# Altium PCB Zotino-DIOT.PCBDOC (part 1 of 11)
Units mil, origin at the board's own origin, x right, y up, seen from the top; angles counter-clockwise.
Board outline 8771.61 x 3949.04 mil, 4 copper layers (TopLayer, Internal Plane 2, Signal Layer 1, BottomLayer), stack 61.54 mil thick; 915 components, 534 nets, 3073 pads, 1180 vias.
Unrouted connection lines stored in the file: 36.
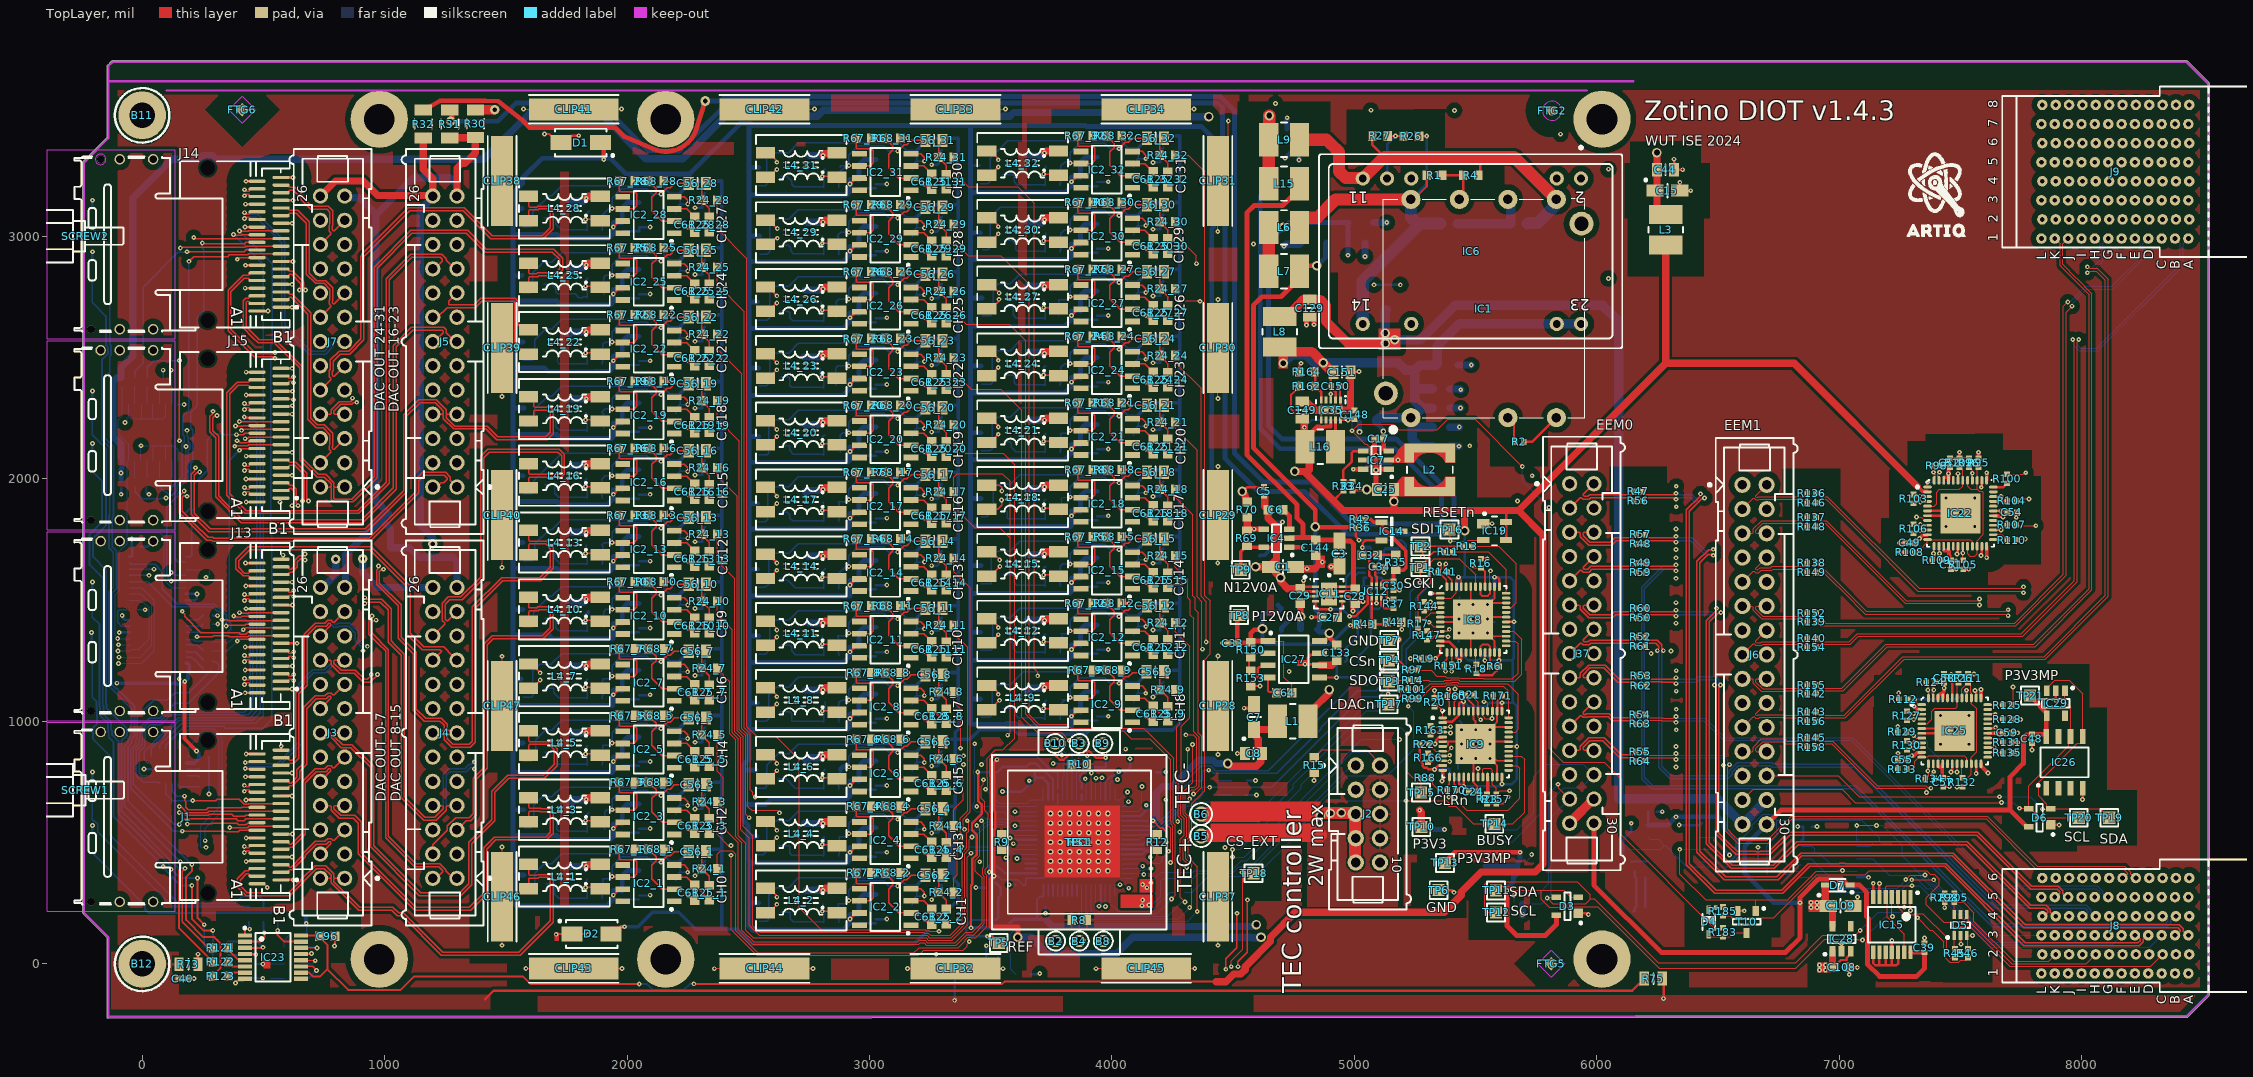
[diagram p0: TopLayer view]
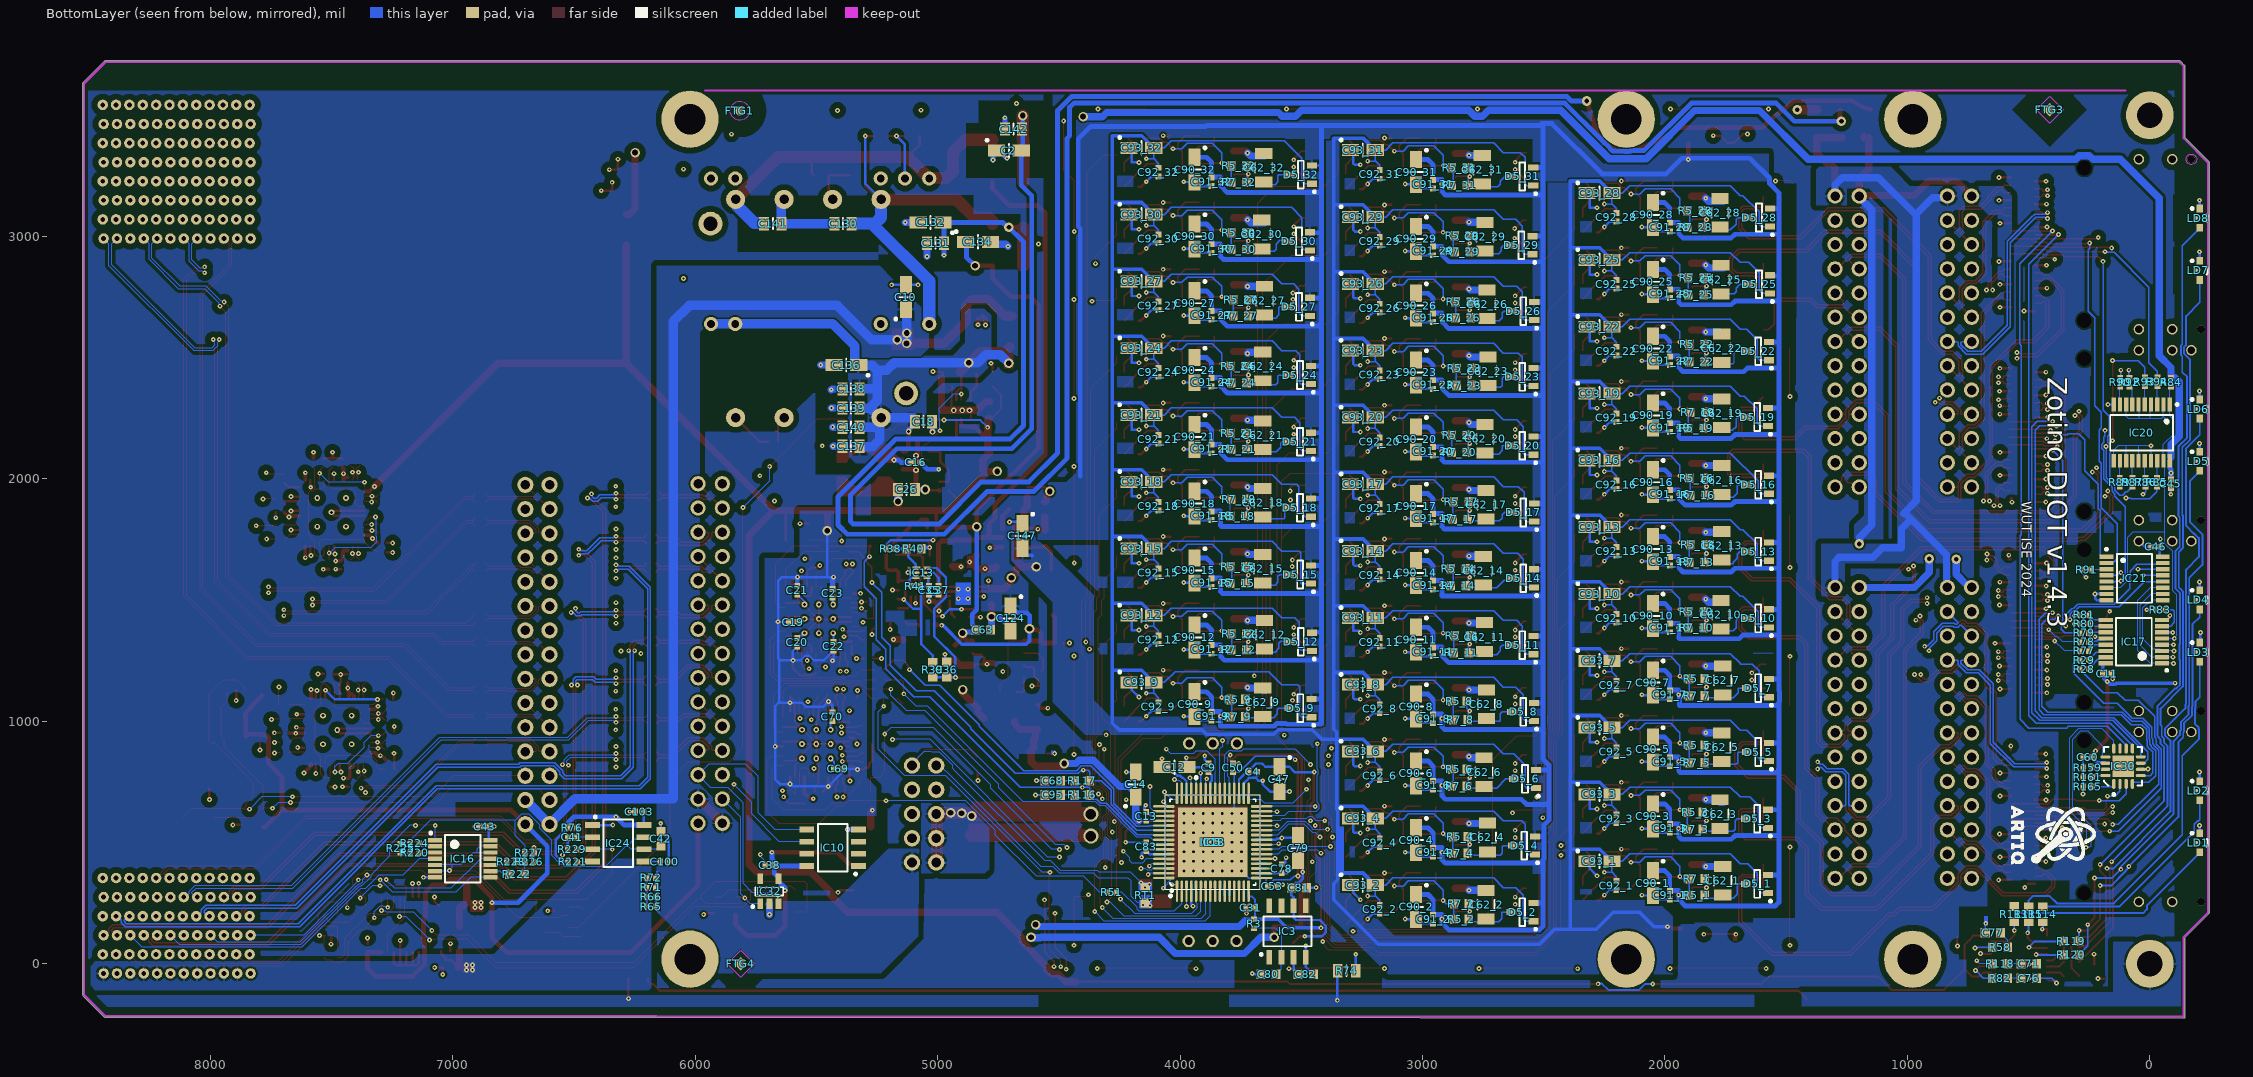
[diagram p1: BottomLayer view, seen from below]
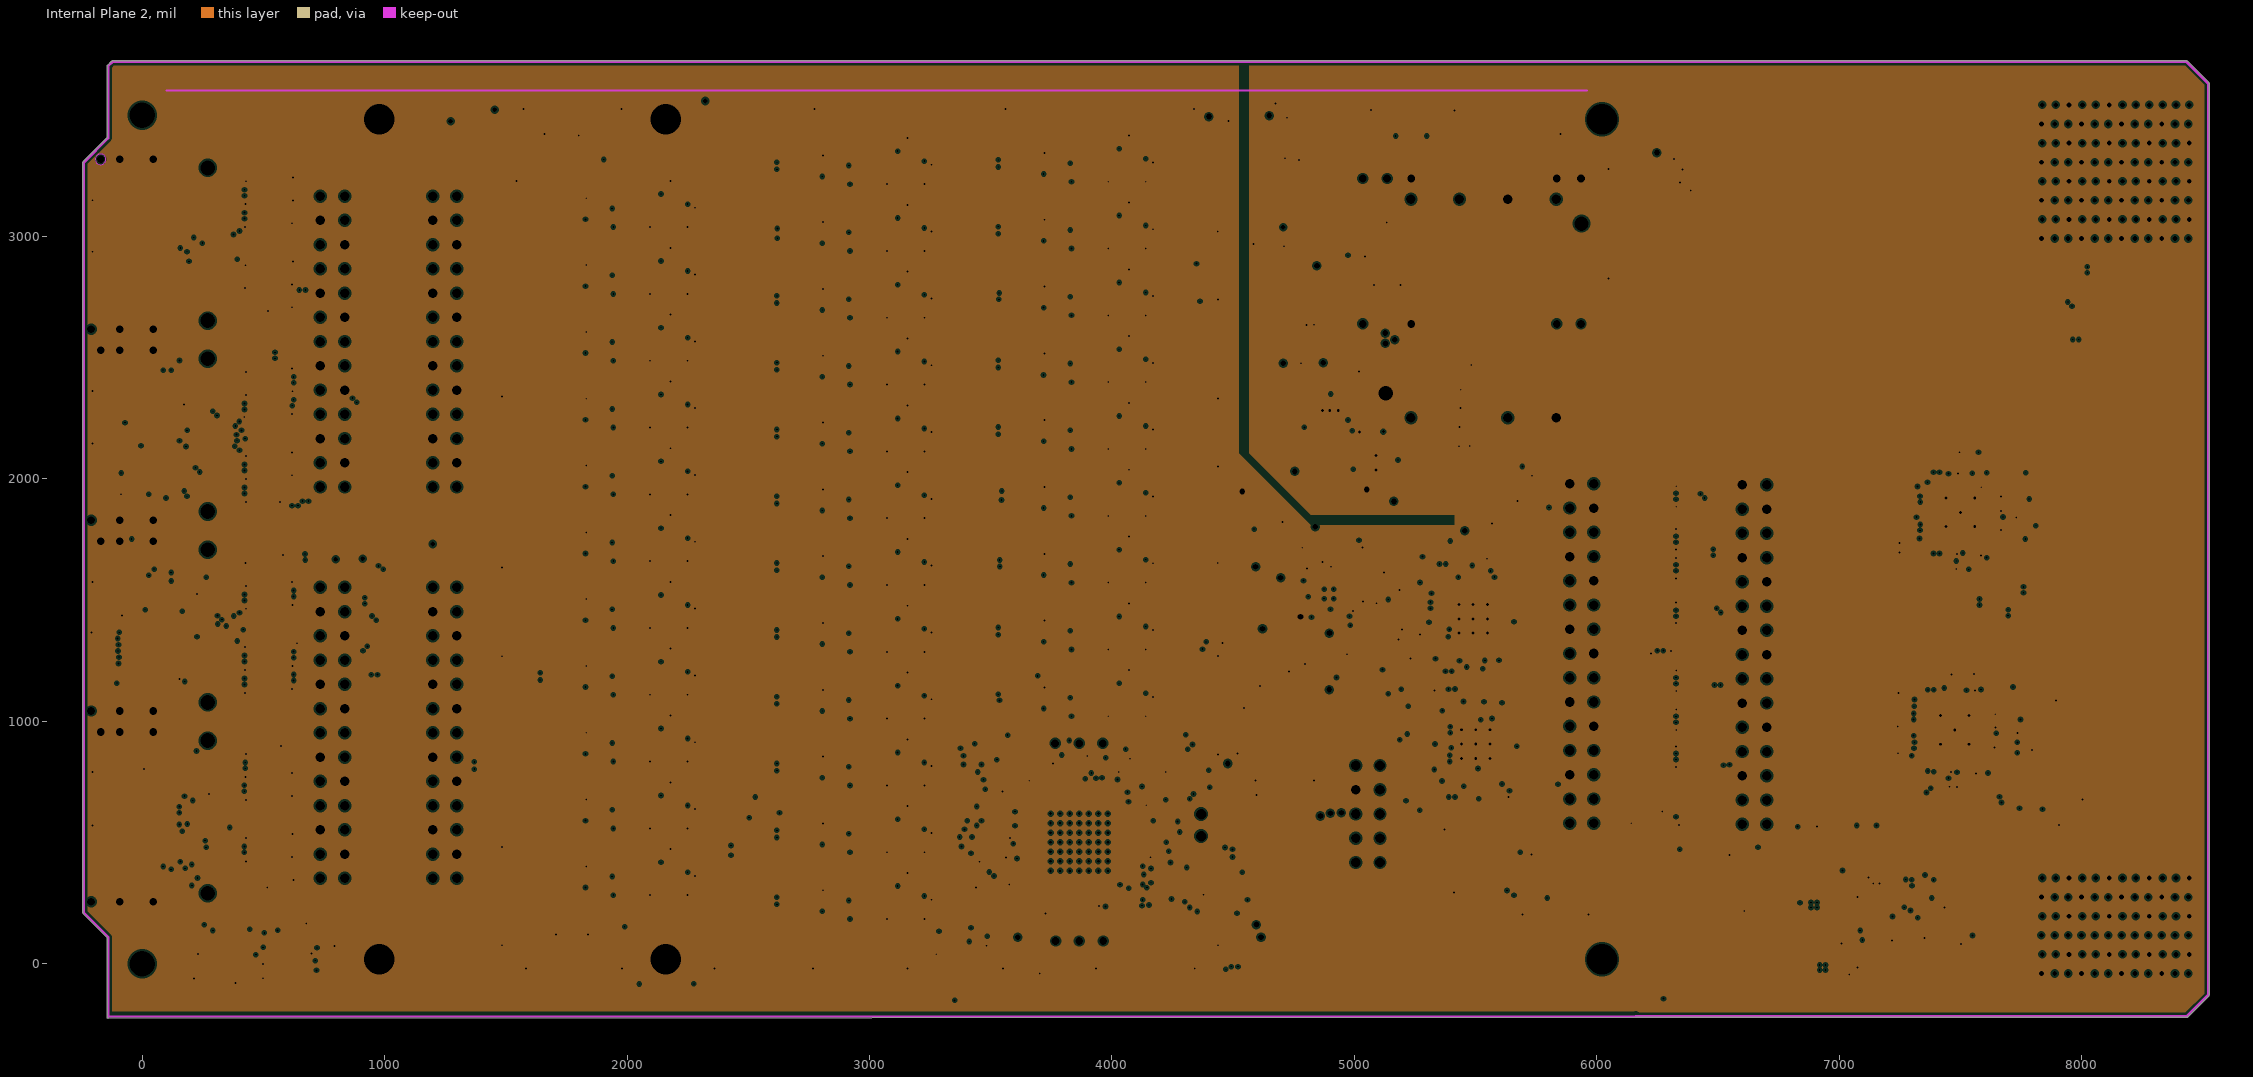
[diagram p2: Internal Plane 2, clearances drawn from the general rule]
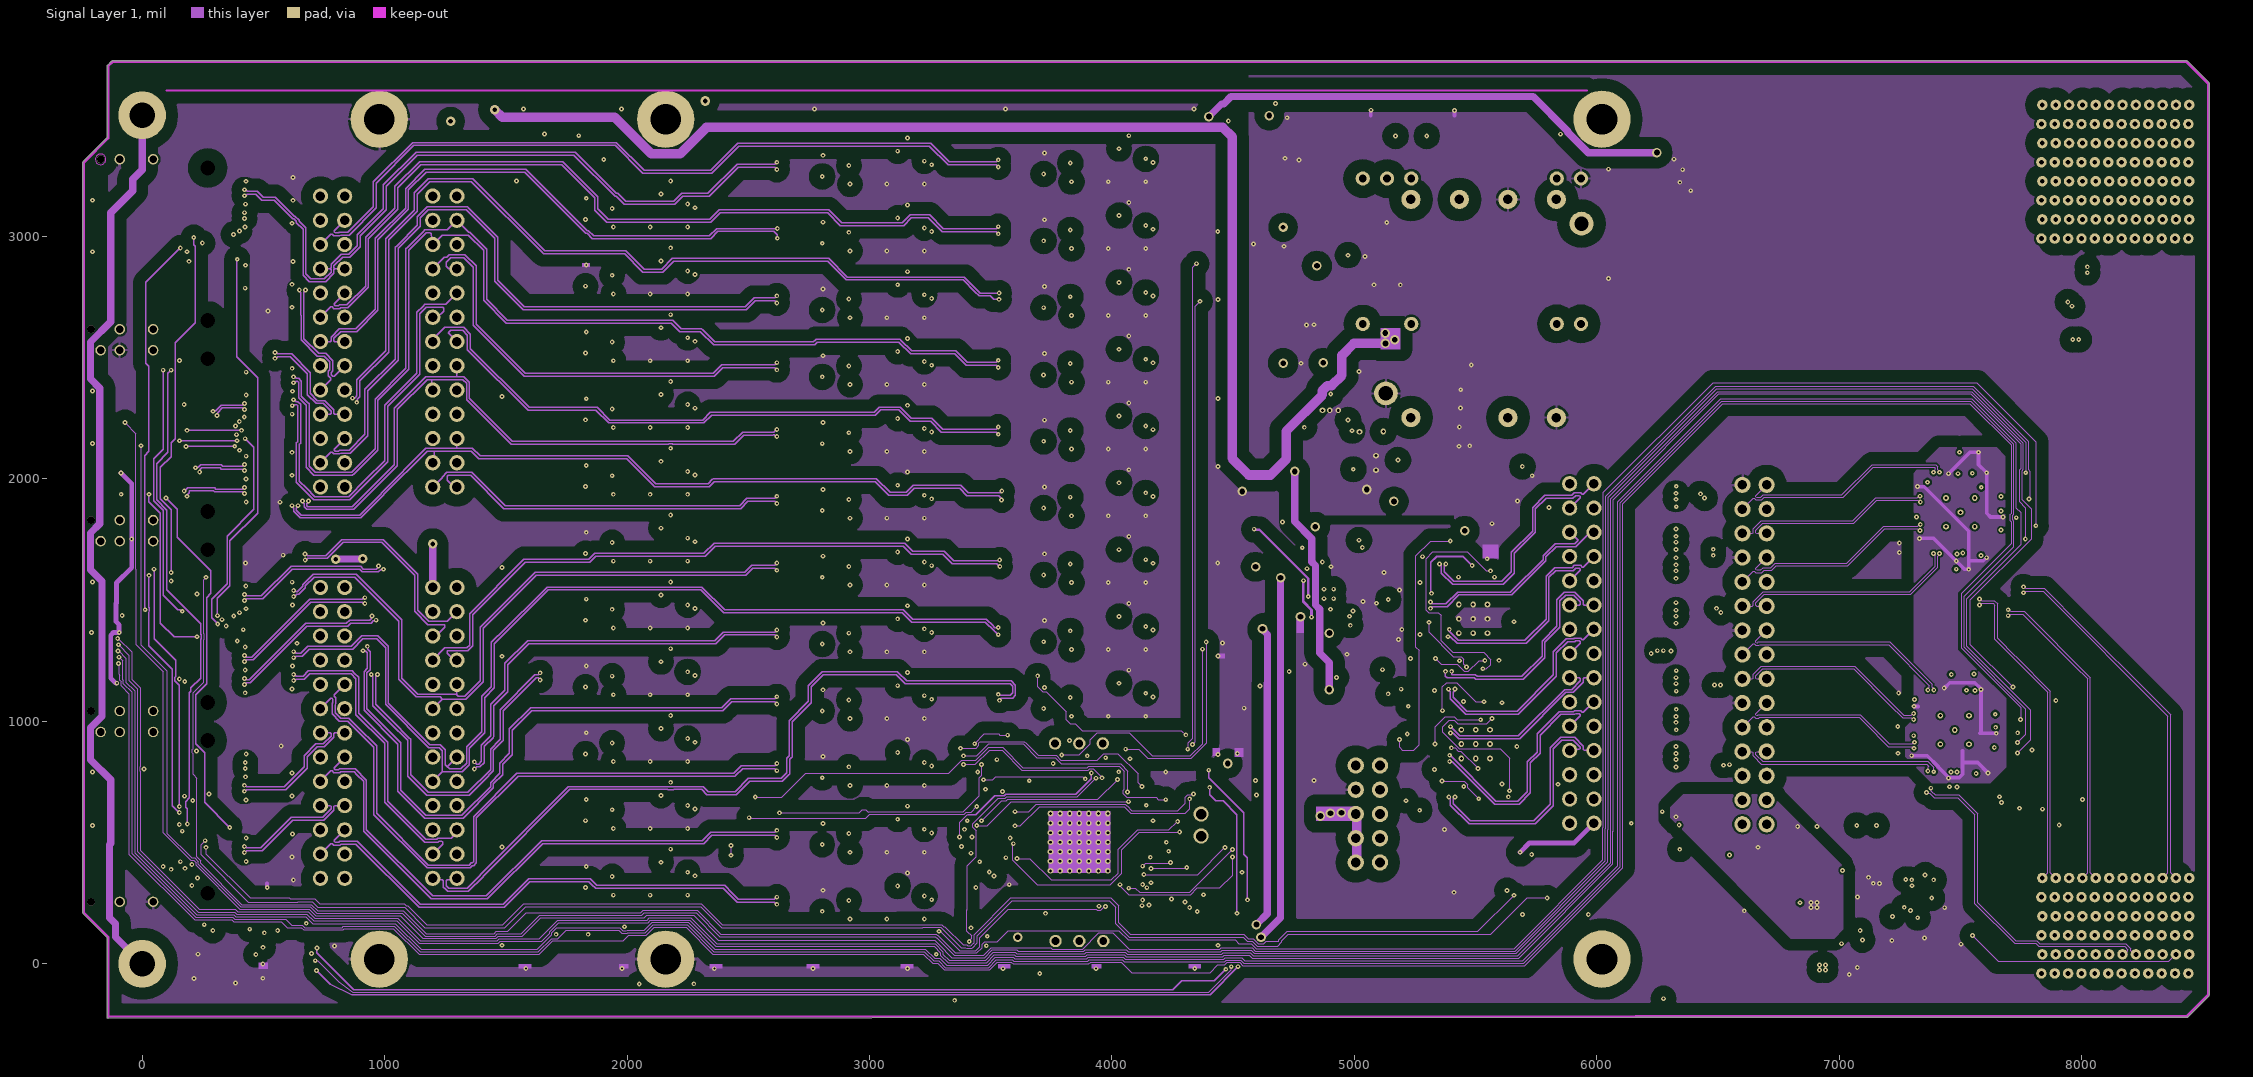
[diagram p3: Signal Layer 1]

## Layer stack, top to bottom
TopSolder: solder mask 0.4, Solder Resist, Dk 3.5
TopLayer: signal copper 1.4
Dielectric1: core 14.1732, FR-4, Dk 4.8
Internal Plane 2: plane copper 1.4169, net GND
Dielectric 3: prepreg 27.5591, Dk 4.2
Signal Layer 1: signal copper 1.4173
Dielectric 5: core 14.1732, Dk 4.2
BottomLayer: signal copper 1.4
BottomSolder: solder mask 0.4, Solder Resist, Dk 3.5

## Board outline
-145.01,108.47 -243.7,207.16 -245.17,210.71 -245.17,3304.89 -243.7,3308.44 -145.01,3407.12 -145.01,3702.3 -143.55,3705.84 -125.84,3723.55 -122.29,3725.02 6142.22,3725.02 8432.83,3725.02 8436.38,3723.55 8524.96,3634.97 8526.43,3631.43 8526.43,-128.42 8524.96,-131.96 8437.42,-219.51 8433.87,-220.98 6160.04,-220.98 -140,-224.01 cw(c-140,-219) -145.01,-219

## Design rules (kind name [scope] priority, off if disabled: settings)
AcuteAngle [All] p1: minimum=6.00000000000000E+0001 checktracksonly=FALSE
Clearance Clearance_GND_L3 [InNamedPolygon('GND_L3')] p1: gap=50 ignorepadtopadclearanceinfootprint=FALSE except(25: Via-Via Via-Fill Via-Poly Via-Region Via-Text Via-Hole)
Clearance Clearance_balancing [InNamedPolygon('balancing')] p2: gap=8.27 ignorepadtopadclearanceinfootprint=FALSE except(12.6: Arc-Fill Arc-Poly Arc-Region Track-Fill Track-Poly Track-Region; 23.62: THPad-Fill THPad-Poly THPad-Region Via-Fill Via-Poly Via-Region Fill-Fill Fill-Poly Fill-Region Poly-Poly Poly-Region Region-Region; 90.55: SMDPad-Fill SMDPad-Poly SMDPad-Region)
Clearance Clearance_DIFF [(InDifferentialPairClass('All Differential Pairs')and IsTrack ) vs (InDifferentialPairClass('All Differential Pairs') and IsTrack  )] p3 off: gap=20 ignorepadtopadclearanceinfootprint=FALSE except(0: Arc-Hole Track-Hole SMDPad-Hole THPad-Hole Via-Hole Fill-Hole Poly-Hole Region-Hole Text-Hole; 5: SMDPad-SMDPad SMDPad-THPad SMDPad-Via SMDPad-Fill SMDPad-Poly SMDPad-Region SMDPad-Text THPad-THPad THPad-Via THPad-Fill THPad-Poly THPad-Region THPad-Text Via-Via Via-Fill Via-Poly Via-Region Via-Text)
Clearance [All] p4: gap=5 ignorepadtopadclearanceinfootprint=FALSE except(0: Arc-Hole Track-Hole SMDPad-Hole THPad-Hole Via-Hole Fill-Hole Poly-Hole Region-Hole Text-Hole; 8: Arc-Poly Track-Poly SMDPad-Poly THPad-Poly Via-Poly Fill-Poly Poly-Poly)
ComponentClearance [All] p1: gap=0 collisioncheckmode=3 verticalgap=0 showdistances=FALSE
DiffPairsRouting [All] p1: maxlimit=6 minlimit=5 mostfreqgap=6 toplayer_minwidth=5 toplayer_maxwidth=6 toplayer_prefwidth=6 midlayer1_minwidth=5 midlayer1_maxwidth=6 midlayer1_prefwidth=6 bottomlayer_minwidth=5 bottomlayer_maxwidth=6 bottomlayer_prefwidth=6 maxuncoupledlength=1000
FabricationTestPointUsage TestPointUsage [All] p1: valid=0 allowmultiple=FALSE
FabricationTestpoint Testpoint [All] p1: side=3 testpointundercomponent=TRUE minsize=40 maxsize=100 preferedsize=60 minholesize=20 maxholesize=40 preferedholesize=32 testpointgrid=1 allowsidetop=TRUE allowsidebottom=TRUE usegrid=TRUE gridtolerance=0.01
Height [All] p1: minheight=0 maxheight=1574.8 prefheight=1574.8
HoleSize [All] p1: absolutevalues=TRUE maxlimit=150 minlimit=1 maxpercent=80.000 minpercent=20.000
HoleToHoleClearance [All] p1: gap=1 allowstackedmicrovias=TRUE
MinimumSolderMaskSliver [All] p1: minsoldermaskwidth=0
PlaneClearance [All] p1: clearance=7.87
PlaneConnect [All] p1: planeconnectstyle=Direct reliefexpansion=20 reliefentries=4 reliefconductorwidth=10 reliefairgap=10
PolygonConnect PolygonConnect_pad [(InPadClass('All Pads'))] p1: connectstyle=Relief reliefconductorwidth=10 reliefentries=4 polygonreliefangle="90 Angle" airgapwidth=10
PolygonConnect [All] p2: connectstyle=Direct reliefconductorwidth=10 reliefentries=4 polygonreliefangle="45 Angle" airgapwidth=10
RoomDefinition Zotino-DIOT [InComponentClass('Zotino-DIOT')] p1 off: confinementstyle=ConfineIn formatcopy=TRUE lockcomponents=FALSE outline -4140,-6217 -2140,-6217 -2140,-5217 -4140,-5217
RoomDefinition U_Supply_DAC [InComponentClass('U_Supply_DAC')] p2 off: confinementstyle=ConfineIn formatcopy=TRUE lockcomponents=FALSE outline 6257.64,2007.41 4741.89,2007.41 4741.89,-157.94 6257.64,-157.94
RoomDefinition U_LVDS_IFC_DAC [InComponentClass('U_LVDS_IFC_DAC')] p3 off: confinementstyle=ConfineIn formatcopy=TRUE lockcomponents=FALSE outline 4702.52,-138.26 6159.21,-138.26 6159.21,1869.61 4702.52,1869.61
RoomDefinition U_Output_channel1 [InComponentClass('U_Output_channel1')] p4 off: confinementstyle=ConfineIn formatcopy=TRUE lockcomponents=FALSE outline 1543.56,224.19 2417.58,224.19 2417.58,499.78 1543.56,499.78
RoomDefinition U_Output_channel2 [InComponentClass('U_Output_channel2')] p5 off: confinementstyle=ConfineIn formatcopy=TRUE lockcomponents=FALSE outline 2519.94,125.76 3393.96,125.76 3393.96,401.35 2519.94,401.35
RoomDefinition U_Output_channel3 [InComponentClass('U_Output_channel3')] p6 off: confinementstyle=ConfineIn formatcopy=TRUE lockcomponents=FALSE outline 1543.56,499.78 2417.58,499.78 2417.58,775.37 1543.56,775.37
RoomDefinition U_Output_channel4 [InComponentClass('U_Output_channel4')] p7 off: confinementstyle=ConfineIn formatcopy=TRUE lockcomponents=FALSE outline 2519.94,401.35 3393.96,401.35 3393.96,676.95 2519.94,676.95
RoomDefinition U_Output_channel5 [InComponentClass('U_Output_channel5')] p8 off: confinementstyle=ConfineIn formatcopy=TRUE lockcomponents=FALSE outline 1543.56,775.37 2417.58,775.37 2417.58,1050.96 1543.56,1050.96
RoomDefinition U_Output_channel6 [InComponentClass('U_Output_channel6')] p9 off: confinementstyle=ConfineIn formatcopy=TRUE lockcomponents=FALSE outline 2519.94,676.95 3393.96,676.95 3393.96,952.54 2519.94,952.54
RoomDefinition U_Output_channel7 [InComponentClass('U_Output_channel7')] p10 off: confinementstyle=ConfineIn formatcopy=TRUE lockcomponents=FALSE outline 1543.56,1050.96 2417.58,1050.96 2417.58,1326.55 1543.56,1326.55
RoomDefinition U_Output_channel8 [InComponentClass('U_Output_channel8')] p11 off: confinementstyle=ConfineIn formatcopy=TRUE lockcomponents=FALSE outline 2519.94,952.54 3393.96,952.54 3393.96,1228.13 2519.94,1228.13
RoomDefinition U_Output_channel9 [InComponentClass('U_Output_channel9')] p12 off: confinementstyle=ConfineIn formatcopy=TRUE lockcomponents=FALSE outline 3433.33,962.38 4307.34,962.38 4307.34,1237.97 3433.33,1237.97
RoomDefinition U_Output_channel10 [InComponentClass('U_Output_channel10')] p13 off: confinementstyle=ConfineIn formatcopy=TRUE lockcomponents=FALSE outline 1543.56,1326.55 2417.58,1326.55 2417.58,1602.14 1543.56,1602.14
RoomDefinition U_Output_channel11 [InComponentClass('U_Output_channel11')] p14 off: confinementstyle=ConfineIn formatcopy=TRUE lockcomponents=FALSE outline 2519.94,1228.13 3393.96,1228.13 3393.96,1503.72 2519.94,1503.72
RoomDefinition U_Output_channel12 [InComponentClass('U_Output_channel12')] p15 off: confinementstyle=ConfineIn formatcopy=TRUE lockcomponents=FALSE outline 3433.33,1237.97 4307.34,1237.97 4307.34,1513.56 3433.33,1513.56
RoomDefinition U_Output_channel13 [InComponentClass('U_Output_channel13')] p16 off: confinementstyle=ConfineIn formatcopy=TRUE lockcomponents=FALSE outline 1543.56,1602.14 2417.58,1602.14 2417.58,1877.73 1543.56,1877.73
RoomDefinition U_Output_channel14 [InComponentClass('U_Output_channel14')] p17 off: confinementstyle=ConfineIn formatcopy=TRUE lockcomponents=FALSE outline 2519.94,1503.72 3393.96,1503.72 3393.96,1779.31 2519.94,1779.31
RoomDefinition U_Output_channel15 [InComponentClass('U_Output_channel15')] p18 off: confinementstyle=ConfineIn formatcopy=TRUE lockcomponents=FALSE outline 3433.33,1513.56 4307.34,1513.56 4307.34,1789.15 3433.33,1789.15
RoomDefinition U_Output_channel16 [InComponentClass('U_Output_channel16')] p19 off: confinementstyle=ConfineIn formatcopy=TRUE lockcomponents=FALSE outline 1543.56,1877.73 2417.58,1877.73 2417.58,2153.32 1543.56,2153.32
RoomDefinition U_Output_channel17 [InComponentClass('U_Output_channel17')] p20 off: confinementstyle=ConfineIn formatcopy=TRUE lockcomponents=FALSE outline 2519.94,1779.31 3393.96,1779.31 3393.96,2054.9 2519.94,2054.9
RoomDefinition U_Output_channel18 [InComponentClass('U_Output_channel18')] p21 off: confinementstyle=ConfineIn formatcopy=TRUE lockcomponents=FALSE outline 3433.33,1789.15 4307.34,1789.15 4307.34,2064.74 3433.33,2064.74
RoomDefinition U_Output_channel19 [InComponentClass('U_Output_channel19')] p22 off: confinementstyle=ConfineIn formatcopy=TRUE lockcomponents=FALSE outline 1543.56,2153.32 2417.58,2153.32 2417.58,2428.91 1543.56,2428.91
RoomDefinition U_Output_channel20 [InComponentClass('U_Output_channel20')] p23 off: confinementstyle=ConfineIn formatcopy=TRUE lockcomponents=FALSE outline 2519.94,2054.9 3393.96,2054.9 3393.96,2330.49 2519.94,2330.49
RoomDefinition U_Output_channel22 [InComponentClass('U_Output_channel22')] p24 off: confinementstyle=ConfineIn formatcopy=TRUE lockcomponents=FALSE outline 1543.56,2428.91 2417.58,2428.91 2417.58,2704.5 1543.56,2704.5
RoomDefinition U_Output_channel23 [InComponentClass('U_Output_channel23')] p25 off: confinementstyle=ConfineIn formatcopy=TRUE lockcomponents=FALSE outline 2519.94,2330.49 3393.96,2330.49 3393.96,2606.08 2519.94,2606.08
RoomDefinition U_Output_channel24 [InComponentClass('U_Output_channel24')] p26 off: confinementstyle=ConfineIn formatcopy=TRUE lockcomponents=FALSE outline 3433.33,2340.33 4307.34,2340.33 4307.34,2615.92 3433.33,2615.92
RoomDefinition U_Output_channel25 [InComponentClass('U_Output_channel25')] p27 off: confinementstyle=ConfineIn formatcopy=TRUE lockcomponents=FALSE outline 1543.56,2704.5 2417.58,2704.5 2417.58,2980.1 1543.56,2980.1
RoomDefinition U_Output_channel26 [InComponentClass('U_Output_channel26')] p28 off: confinementstyle=ConfineIn formatcopy=TRUE lockcomponents=FALSE outline 2519.94,2606.08 3393.96,2606.08 3393.96,2881.67 2519.94,2881.67
RoomDefinition U_Output_channel27 [InComponentClass('U_Output_channel27')] p29 off: confinementstyle=ConfineIn formatcopy=TRUE lockcomponents=FALSE outline 3433.33,2615.92 4307.34,2615.92 4307.34,2891.51 3433.33,2891.51
RoomDefinition U_Output_channel28 [InComponentClass('U_Output_channel28')] p30 off: confinementstyle=ConfineIn formatcopy=TRUE lockcomponents=FALSE outline 1543.56,2980.09 2417.58,2980.09 2417.58,3255.69 1543.56,3255.69
RoomDefinition U_Output_channel29 [InComponentClass('U_Output_channel29')] p31 off: confinementstyle=ConfineIn formatcopy=TRUE lockcomponents=FALSE outline 2519.94,2881.67 3393.96,2881.67 3393.96,3157.26 2519.94,3157.26
RoomDefinition U_Output_channel30 [InComponentClass('U_Output_channel30')] p32 off: confinementstyle=ConfineIn formatcopy=TRUE lockcomponents=FALSE outline 3433.33,2891.51 4307.34,2891.51 4307.34,3167.1 3433.33,3167.1
RoomDefinition U_Output_channel31 [InComponentClass('U_Output_channel31')] p33 off: confinementstyle=ConfineIn formatcopy=TRUE lockcomponents=FALSE outline 2519.94,3157.26 3393.96,3157.26 3393.96,3432.85 2519.94,3432.85
RoomDefinition U_Output_channel32 [InComponentClass('U_Output_channel32')] p34 off: confinementstyle=ConfineIn formatcopy=TRUE lockcomponents=FALSE outline 3433.33,3167.1 4307.34,3167.1 4307.34,3442.69 3433.33,3442.69
RoomDefinition U_Output_channel21 [InComponentClass('U_Output_channel21')] p35 off: confinementstyle=ConfineIn formatcopy=TRUE lockcomponents=FALSE outline 3433.33,2064.74 4307.34,2064.74 4307.34,2340.33 3433.33,2340.33
RoomDefinition U_DAC_32CH [InComponentClass('U_DAC_32CH')] p36 off: confinementstyle=ConfineIn formatcopy=TRUE lockcomponents=FALSE outline 4294,850 3517,850 3517,109 4294,109
RoutingVias [All] p1: holewidth=7.87 width=19.68 viastyle="Through Hole" minholewidth=7.87 minwidth=19.68 maxholewidth=28 maxwidth=50
SilkToSilkClearance [All] p1: silktosilkclearance=0
SilkToSolderMaskClearance SilkscreenOverComponentPads [IsPad] p1: minsilkscreentomaskgap=0 clearancetoexposedcopper=TRUE
SolderMaskExpansion SolderMaskExpansion_VIA [IsVia] p1: expansion=4 istentingtop=TRUE
SolderMaskExpansion [All] p2: expansion=2 istentingtop=FALSE
SupplyNets "Schematic Supply Nets" [InNet('P3V3A')] p1: voltage=0.000
SupplyNets "Schematic Supply Nets_12" [InNet('P3V3_MP')] p2: voltage=0.000
SupplyNets "Schematic Supply Nets_11" [InNet('GND')] p3: voltage=0.000
SupplyNets "Schematic Supply Nets_10" [InNet('P13V0_SCSI')] p4: voltage=0.000
SupplyNets "Schematic Supply Nets_9" [InNet('P3V3_MP_B')] p5: voltage=0.000
SupplyNets "Schematic Supply Nets_8" [InNet('P12V0A')] p6: voltage=0.000
SupplyNets "Schematic Supply Nets_7" [InNet('STRIP1')] p7: voltage=0.000
SupplyNets "Schematic Supply Nets_6" [InNet('N13V0_SCSI')] p8: voltage=0.000
SupplyNets "Schematic Supply Nets_5" [InNet('N12V0A')] p9: voltage=0.000
SupplyNets "Schematic Supply Nets_3" [InNet('P12V0')] p10: voltage=0.000
SupplyNets "Schematic Supply Nets_2" [InNet('P12V0_CPCIS')] p11: voltage=0.000
SupplyNets "Schematic Supply Nets_1" [InNet('P3V3')] p12: voltage=0.000
ViasUnderSMD [All] p1: allowed=FALSE
Width [All] p1: maxlimit=50 minlimit=5 preferedwidth=5
18 further rules are at their usual default settings.

## Classes and differential pairs
component class U_Zotino-connector: C11 C15 C44 C45 C46 C60 IC17 IC20 IC21 IC30 J1 J3 J4 J5 J7 J13 J14 J15 L3 R28 R29 R77 R78 R79 R80 R81 R83 R84 R85 R86 R87 R89 R90 R91 R92 R93 R94 R159 R161 R165
net class BP_IO.LVDS_P[0..15]: BP_IO.LVDS_P0 BP_IO.LVDS_P1 BP_IO.LVDS_P2 BP_IO.LVDS_P3 BP_IO.LVDS_P4 BP_IO.LVDS_P5 BP_IO.LVDS_P6 BP_IO.LVDS_P7 BP_IO.LVDS_P8 BP_IO.LVDS_P9 BP_IO.LVDS_P10 BP_IO.LVDS_P11 BP_IO.LVDS_P12 BP_IO.LVDS_P13 BP_IO.LVDS_P14 BP_IO.LVDS_P15
net class BP_IO.LVDS_N[0..15]: BP_IO.LVDS_N0 BP_IO.LVDS_N1 BP_IO.LVDS_N2 BP_IO.LVDS_N3 BP_IO.LVDS_N4 BP_IO.LVDS_N5 BP_IO.LVDS_N6 BP_IO.LVDS_N7 BP_IO.LVDS_N8 BP_IO.LVDS_N9 BP_IO.LVDS_N10 BP_IO.LVDS_N11 BP_IO.LVDS_N12 BP_IO.LVDS_N13 BP_IO.LVDS_N14 BP_IO.LVDS_N15
component class U_DIOT_Connectors_P1_P6: C41 C42 C43 C100 C103 C108 C109 D4 D5 D7 IC16 IC24 IC28 J8 J9 R76 R183 R185 R205 R220 R221 R222 R223 R224 R225 R226 R227 R229 R298 T10
net class DAC_OUT_P[32..1]: DAC_OUT_P1 DAC_OUT_P2 DAC_OUT_P3 DAC_OUT_P4 DAC_OUT_P5 DAC_OUT_P6 DAC_OUT_P7 DAC_OUT_P8 DAC_OUT_P9 DAC_OUT_P10 DAC_OUT_P11 DAC_OUT_P12 DAC_OUT_P13 DAC_OUT_P14 DAC_OUT_P15 DAC_OUT_P16 DAC_OUT_P17 DAC_OUT_P18 DAC_OUT_P19 DAC_OUT_P20 DAC_OUT_P21 DAC_OUT_P22 DAC_OUT_P23 DAC_OUT_P24 DAC_OUT_P25 DAC_OUT_P26 DAC_OUT_P27 DAC_OUT_P28 DAC_OUT_P29 DAC_OUT_P30 DAC_OUT_P31 DAC_OUT_P32
net class DAC_OUT_N[32..1]: DAC_OUT_N1 DAC_OUT_N2 DAC_OUT_N3 DAC_OUT_N4 DAC_OUT_N5 DAC_OUT_N6 DAC_OUT_N7 DAC_OUT_N8 DAC_OUT_N9 DAC_OUT_N10 DAC_OUT_N11 DAC_OUT_N12 DAC_OUT_N13 DAC_OUT_N14 DAC_OUT_N15 DAC_OUT_N16 DAC_OUT_N17 DAC_OUT_N18 DAC_OUT_N19 DAC_OUT_N20 DAC_OUT_N21 DAC_OUT_N22 DAC_OUT_N23 DAC_OUT_N24 DAC_OUT_N25 DAC_OUT_N26 DAC_OUT_N27 DAC_OUT_N28 DAC_OUT_N29 DAC_OUT_N30 DAC_OUT_N31 DAC_OUT_N32
net class VOUT[32..1]: VOUT1 VOUT2 VOUT3 VOUT4 VOUT5 VOUT6 VOUT7 VOUT8 VOUT9 VOUT10 VOUT11 VOUT12 VOUT13 VOUT14 VOUT15 VOUT16 VOUT17 VOUT18 VOUT19 VOUT20 VOUT21 VOUT22 VOUT23 VOUT24 VOUT25 VOUT26 VOUT27 VOUT28 VOUT29 VOUT30 VOUT31 VOUT32
component class U_LVDS_IFC_DAC: C19 C20 C21 C22 C23 C24 C38 C39 C48 C49 C51 C52 C54 C55 C57 C58 C59 C69 C70 D3 D6 IC8 IC9 IC10 IC15 IC22 IC25 IC26 IC29 IC32 J6 J37 R6 R11 R13 R14 R16 R17 R18 R19 R20 R21 R22 R23 R45 R46 R47 R48 R49 R50 R51 R52 R53 R54 R55 R56 R57 R59 R60 R61 R62 R63 R64 R65 R66 R71 R72 R88 R95 R96 R97 R98 R99 R100 R101 R102 R103 R104 R105 R106 R107 R108 R109 R110 R111 R112 R124 R125 R126 R127 R128 R129 R130 R131 R132 R133 R134 R135 R136 R137 R138 R139 R140 R141 R142 R143 R144 R145 R146 R147 R148 R149 R151 R152 R154 R155 R156 R157 R158 R160 R163 R166 R170 R171 TP11 TP12 TP13 TP14 TP19 TP20 TP21
component class Zotino-DIOT: B2 B3 B4 B5 B6 B8 B9 B10 B11 B12 B? C40 C68 C71 C95 C96 CLIP28 CLIP29 CLIP30 CLIP31 CLIP32 CLIP33 CLIP34 CLIP37 CLIP38 CLIP39 CLIP40 CLIP41 CLIP42 CLIP43 CLIP44 CLIP45 CLIP46 CLIP47 FTG1 FTG2 FTG3 FTG4 FTG5 FTG6 HS1 IC19 IC23 J2 LD1 LD2 LD4 LD5 LD6 LD8 R8 R9 R10 R12 R15 R73 R74 R75 R113 R114 R115 R116 R117 R118 R119 R120 R121 R122 R123 RT1 SCREW1 SCREW2 TEC1 TP18
component class U_DAC_32CH: C1 C7 C8 C9 C12 C13 C14 C31 C33 C47 C50 C53 C76 C77 C78 C79 C80 C81 C82 C83 IC3 IC5 IC18 L1 R3 R58 R82 TP1 TP2 TP3 TP4 TP5 TP15 TP16 TP17
component class U_Supply_DAC: C2 C3 C4 C5 C6 C10 C16 C17 C18 C25 C26 C27 C28 C29 C30 C32 C34 C35 C36 C37 C63 C64 C124 C129 C130 C131 C132 C133 C134 C136 C137 C138 C139 C140 C141 C142 C144 C147 C148 C149 C150 C151 D1 D2 IC1 IC4 IC6 IC7 IC11 IC12 IC13 IC14 IC27 IC35 L2 L6 L7 L8 L9 L15 L16 R1 R2 R4 R26 R27 R30 R31 R32 R33 R34 R35 R36 R37 R38 R39 R40 R41 R42 R43 R44 R69 R70 R150 R153 R162 R164 TP6 TP7 TP8 TP9 TP10
channel class Output_channel: U_Output_channel1 U_Output_channel2 U_Output_channel3 U_Output_channel4 U_Output_channel5 U_Output_channel6 U_Output_channel7 U_Output_channel8 U_Output_channel9 U_Output_channel10 U_Output_channel11 U_Output_channel12 U_Output_channel13 U_Output_channel14 U_Output_channel15 U_Output_channel16 U_Output_channel17 U_Output_channel18 U_Output_channel19 U_Output_channel20 U_Output_channel21 U_Output_channel22 U_Output_channel23 U_Output_channel24 U_Output_channel25 U_Output_channel26 U_Output_channel27 U_Output_channel28 U_Output_channel29 U_Output_channel30 U_Output_channel31 U_Output_channel32
component class U_Output_channel32: C56_32 C61_32 C62_32 C90_32 C91_32 C92_32 C93_32 D5_32 IC2_32 L4_32 R5_32 R7_32 R24_32 R25_32 R67_32 R68_32
component class U_Output_channel31: C56_31 C61_31 C62_31 C90_31 C91_31 C92_31 C93_31 D5_31 IC2_31 L4_31 R5_31 R7_31 R24_31 R25_31 R67_31 R68_31
component class U_Output_channel30: C56_30 C61_30 C62_30 C90_30 C91_30 C92_30 C93_30 D5_30 IC2_30 L4_30 R5_30 R7_30 R24_30 R25_30 R67_30 R68_30
component class U_Output_channel29: C56_29 C61_29 C62_29 C90_29 C91_29 C92_29 C93_29 D5_29 IC2_29 L4_29 R5_29 R7_29 R24_29 R25_29 R67_29 R68_29
component class U_Output_channel28: C56_28 C61_28 C62_28 C90_28 C91_28 C92_28 C93_28 D5_28 IC2_28 L4_28 R5_28 R7_28 R24_28 R25_28 R67_28 R68_28
component class U_Output_channel27: C56_27 C61_27 C62_27 C90_27 C91_27 C92_27 C93_27 D5_27 IC2_27 L4_27 R5_27 R7_27 R24_27 R25_27 R67_27 R68_27
component class U_Output_channel26: C56_26 C61_26 C62_26 C90_26 C91_26 C92_26 C93_26 D5_26 IC2_26 L4_26 R5_26 R7_26 R24_26 R25_26 R67_26 R68_26
component class U_Output_channel25: C56_25 C61_25 C62_25 C90_25 C91_25 C92_25 C93_25 D5_25 IC2_25 L4_25 R5_25 R7_25 R24_25 R25_25 R67_25 R68_25
component class U_Output_channel24: C56_24 C61_24 C62_24 C90_24 C91_24 C92_24 C93_24 D5_24 IC2_24 L4_24 R5_24 R7_24 R24_24 R25_24 R67_24 R68_24
component class U_Output_channel23: C56_23 C61_23 C62_23 C90_23 C91_23 C92_23 C93_23 D5_23 IC2_23 L4_23 R5_23 R7_23 R24_23 R25_23 R67_23 R68_23
component class U_Output_channel22: C56_22 C61_22 C62_22 C90_22 C91_22 C92_22 C93_22 D5_22 IC2_22 L4_22 R5_22 R7_22 R24_22 R25_22 R67_22 R68_22
component class U_Output_channel21: C56_21 C61_21 C62_21 C90_21 C91_21 C92_21 C93_21 D5_21 IC2_21 L4_21 R5_21 R7_21 R24_21 R25_21 R67_21 R68_21
component class U_Output_channel20: C56_20 C61_20 C62_20 C90_20 C91_20 C92_20 C93_20 D5_20 IC2_20 L4_20 R5_20 R7_20 R24_20 R25_20 R67_20 R68_20
component class U_Output_channel19: C56_19 C61_19 C62_19 C90_19 C91_19 C92_19 C93_19 D5_19 IC2_19 L4_19 R5_19 R7_19 R24_19 R25_19 R67_19 R68_19
component class U_Output_channel18: C56_18 C61_18 C62_18 C90_18 C91_18 C92_18 C93_18 D5_18 IC2_18 L4_18 R5_18 R7_18 R24_18 R25_18 R67_18 R68_18
component class U_Output_channel17: C56_17 C61_17 C62_17 C90_17 C91_17 C92_17 C93_17 D5_17 IC2_17 L4_17 R5_17 R7_17 R24_17 R25_17 R67_17 R68_17
component class U_Output_channel16: C56_16 C61_16 C62_16 C90_16 C91_16 C92_16 C93_16 D5_16 IC2_16 L4_16 R5_16 R7_16 R24_16 R25_16 R67_16 R68_16
component class U_Output_channel15: C56_15 C61_15 C62_15 C90_15 C91_15 C92_15 C93_15 D5_15 IC2_15 L4_15 R5_15 R7_15 R24_15 R25_15 R67_15 R68_15
component class U_Output_channel14: C56_14 C61_14 C62_14 C90_14 C91_14 C92_14 C93_14 D5_14 IC2_14 L4_14 R5_14 R7_14 R24_14 R25_14 R67_14 R68_14
component class U_Output_channel13: C56_13 C61_13 C62_13 C90_13 C91_13 C92_13 C93_13 D5_13 IC2_13 L4_13 R5_13 R7_13 R24_13 R25_13 R67_13 R68_13
component class U_Output_channel12: C56_12 C61_12 C62_12 C90_12 C91_12 C92_12 C93_12 D5_12 IC2_12 L4_12 R5_12 R7_12 R24_12 R25_12 R67_12 R68_12
component class U_Output_channel11: C56_11 C61_11 C62_11 C90_11 C91_11 C92_11 C93_11 D5_11 IC2_11 L4_11 R5_11 R7_11 R24_11 R25_11 R67_11 R68_11
component class U_Output_channel10: C56_10 C61_10 C62_10 C90_10 C91_10 C92_10 C93_10 D5_10 IC2_10 L4_10 R5_10 R7_10 R24_10 R25_10 R67_10 R68_10
component class U_Output_channel9: C56_9 C61_9 C62_9 C90_9 C91_9 C92_9 C93_9 D5_9 IC2_9 L4_9 R5_9 R7_9 R24_9 R25_9 R67_9 R68_9
component class U_Output_channel8: C56_8 C61_8 C62_8 C90_8 C91_8 C92_8 C93_8 D5_8 IC2_8 L4_8 R5_8 R7_8 R24_8 R25_8 R67_8 R68_8
component class U_Output_channel7: C56_7 C61_7 C62_7 C90_7 C91_7 C92_7 C93_7 D5_7 IC2_7 L4_7 R5_7 R7_7 R24_7 R25_7 R67_7 R68_7
component class U_Output_channel6: C56_6 C61_6 C62_6 C90_6 C91_6 C92_6 C93_6 D5_6 IC2_6 L4_6 R5_6 R7_6 R24_6 R25_6 R67_6 R68_6
component class U_Output_channel5: C56_5 C61_5 C62_5 C90_5 C91_5 C92_5 C93_5 D5_5 IC2_5 L4_5 R5_5 R7_5 R24_5 R25_5 R67_5 R68_5
component class U_Output_channel4: C56_4 C61_4 C62_4 C90_4 C91_4 C92_4 C93_4 D5_4 IC2_4 L4_4 R5_4 R7_4 R24_4 R25_4 R67_4 R68_4
component class U_Output_channel3: C56_3 C61_3 C62_3 C90_3 C91_3 C92_3 C93_3 D5_3 IC2_3 L4_3 R5_3 R7_3 R24_3 R25_3 R67_3 R68_3
component class U_Output_channel2: C56_2 C61_2 C62_2 C90_2 C91_2 C92_2 C93_2 D5_2 IC2_2 L4_2 R5_2 R7_2 R24_2 R25_2 R67_2 R68_2
component class U_Output_channel1: C56_1 C61_1 C62_1 C90_1 C91_1 C92_1 C93_1 D5_1 IC2_1 L4_1 R5_1 R7_1 R24_1 R25_1 R67_1 R68_1
differential pair BP_IO.LVDS15: +BP_IO.LVDS_P15 -BP_IO.LVDS_N15
differential pair BP_IO.LVDS14: +BP_IO.LVDS_P14 -BP_IO.LVDS_N14
differential pair BP_IO.LVDS13: +BP_IO.LVDS_P13 -BP_IO.LVDS_N13
differential pair BP_IO.LVDS12: +BP_IO.LVDS_P12 -BP_IO.LVDS_N12
differential pair BP_IO.LVDS11: +BP_IO.LVDS_P11 -BP_IO.LVDS_N11
differential pair BP_IO.LVDS10: +BP_IO.LVDS_P10 -BP_IO.LVDS_N10
differential pair BP_IO.LVDS9: +BP_IO.LVDS_P9 -BP_IO.LVDS_N9
differential pair BP_IO.LVDS8: +BP_IO.LVDS_P8 -BP_IO.LVDS_N8
differential pair EEM1_LVDS7: +EEM1_LVDS7_P -EEM1_LVDS7_N
differential pair EEM1_LVDS6: +EEM1_LVDS6_P -EEM1_LVDS6_N
differential pair EEM1_LVDS5: +EEM1_LVDS5_P -EEM1_LVDS5_N
differential pair EEM1_LVDS4: +EEM1_LVDS4_P -EEM1_LVDS4_N
differential pair EEM1_LVDS3: +EEM1_LVDS3_P -EEM1_LVDS3_N
differential pair EEM1_LVDS2: +EEM1_LVDS2_P -EEM1_LVDS2_N
differential pair EEM1_LVDS1: +EEM1_LVDS1_P -EEM1_LVDS1_N
differential pair EEM1_LVDS0: +EEM1_LVDS0_P -EEM1_LVDS0_N
differential pair EEM0_LVDS7: +EEM0_LVDS7_P -EEM0_LVDS7_N
differential pair EEM0_LVDS6: +EEM0_LVDS6_P -EEM0_LVDS6_N
differential pair EEM0_LVDS5: +EEM0_LVDS5_P -EEM0_LVDS5_N
differential pair EEM0_LVDS4: +EEM0_LVDS4_P -EEM0_LVDS4_N
differential pair EEM0_LVDS3: +EEM0_LVDS3_P -EEM0_LVDS3_N
differential pair EEM0_LVDS2: +EEM0_LVDS2_P -EEM0_LVDS2_N
differential pair EEM0_LVDS1: +EEM0_LVDS1_P -EEM0_LVDS1_N
differential pair EEM0_LVDS0: +EEM0_LVDS0_P -EEM0_LVDS0_N
differential pair BP_IO.LVDS7: +BP_IO.LVDS_P7 -BP_IO.LVDS_N7
differential pair BP_IO.LVDS6: +BP_IO.LVDS_P6 -BP_IO.LVDS_N6
differential pair BP_IO.LVDS5: +BP_IO.LVDS_P5 -BP_IO.LVDS_N5
differential pair BP_IO.LVDS4: +BP_IO.LVDS_P4 -BP_IO.LVDS_N4
differential pair BP_IO.LVDS3: +BP_IO.LVDS_P3 -BP_IO.LVDS_N3
differential pair BP_IO.LVDS2: +BP_IO.LVDS_P2 -BP_IO.LVDS_N2
differential pair BP_IO.LVDS1: +BP_IO.LVDS_P1 -BP_IO.LVDS_N1
differential pair BP_IO.LVDS0: +BP_IO.LVDS_P0 -BP_IO.LVDS_N0
differential pair DAC_OUT1: +DAC_OUT_P1 -DAC_OUT_N1
differential pair DAC_OUT2: +DAC_OUT_P2 -DAC_OUT_N2
differential pair DAC_OUT3: +DAC_OUT_P3 -DAC_OUT_N3
differential pair DAC_OUT4: +DAC_OUT_P4 -DAC_OUT_N4
differential pair DAC_OUT5: +DAC_OUT_P5 -DAC_OUT_N5
differential pair DAC_OUT6: +DAC_OUT_P6 -DAC_OUT_N6
differential pair DAC_OUT7: +DAC_OUT_P7 -DAC_OUT_N7
differential pair DAC_OUT8: +DAC_OUT_P8 -DAC_OUT_N8
differential pair DAC_OUT9: +DAC_OUT_P9 -DAC_OUT_N9
differential pair DAC_OUT10: +DAC_OUT_P10 -DAC_OUT_N10
differential pair DAC_OUT11: +DAC_OUT_P11 -DAC_OUT_N11
differential pair DAC_OUT12: +DAC_OUT_P12 -DAC_OUT_N12
differential pair DAC_OUT13: +DAC_OUT_P13 -DAC_OUT_N13
differential pair DAC_OUT14: +DAC_OUT_P14 -DAC_OUT_N14
differential pair DAC_OUT15: +DAC_OUT_P15 -DAC_OUT_N15
differential pair DAC_OUT16: +DAC_OUT_P16 -DAC_OUT_N16
differential pair DAC_OUT17: +DAC_OUT_P17 -DAC_OUT_N17
differential pair DAC_OUT18: +DAC_OUT_P18 -DAC_OUT_N18
differential pair DAC_OUT19: +DAC_OUT_P19 -DAC_OUT_N19
differential pair DAC_OUT20: +DAC_OUT_P20 -DAC_OUT_N20
differential pair DAC_OUT21: +DAC_OUT_P21 -DAC_OUT_N21
differential pair DAC_OUT22: +DAC_OUT_P22 -DAC_OUT_N22
differential pair DAC_OUT23: +DAC_OUT_P23 -DAC_OUT_N23
differential pair DAC_OUT24: +DAC_OUT_P24 -DAC_OUT_N24
differential pair DAC_OUT25: +DAC_OUT_P25 -DAC_OUT_N25
differential pair DAC_OUT26: +DAC_OUT_P26 -DAC_OUT_N26
differential pair DAC_OUT27: +DAC_OUT_P27 -DAC_OUT_N27
differential pair DAC_OUT28: +DAC_OUT_P28 -DAC_OUT_N28
differential pair DAC_OUT29: +DAC_OUT_P29 -DAC_OUT_N29
differential pair DAC_OUT30: +DAC_OUT_P30 -DAC_OUT_N30
differential pair DAC_OUT31: +DAC_OUT_P31 -DAC_OUT_N31
differential pair DAC_OUT32: +DAC_OUT_P32 -DAC_OUT_N32

## Components (designator, comment, footprint, x,y, rotation, side; value= is the part's Value field where it differs from the comment)
B2 "Plated Hole" c130h80 3767.48,94.02 r0 top locked
B3 "Plated Hole" c130h80 3865.38,908.98 r0 top locked
B4 "Plated Hole" c130h80 3865.38,94.02 r0 top locked
B5 "Plated Hole" c160h110 4367.87,527.09 r0 top
B6 "Plated Hole" c160h110 4367.87,617.65 r0 top
B8 "Plated Hole" c130h80 3964.33,94.02 r180 top locked
B9 "Plated Hole" c130h80 3962.36,908.98 r180 top locked
B10 "Plated Hole" c130h80 3765.51,908.98 r0 top locked
B11 "Plated Hole" MTG270_500 0,3500 r90 top
B12 "Plated Hole" MTG270_500 0,0 r90 top
C1 "10uF" CAPMP3216X180N 4706.46,1637.33 r180 top
C2 "10uF" CAPMP3216X180N 4706.46,3354.73 r180 bottom
C3 "10uF" CAPMP3216X180N 4938.74,1692.45 r90 top
C4 "100nF" CAPC1005X55N 3700.26,792.16 r0 bottom
C5 "100nF" CAPC1005X55N 4627.72,1948.35 r270 top
C6 "10nF" CAPC1608X87N 4674.96,1873.55 r0 top
C7 "10uF" CAPMP3216X180N 4586.79,1017.89 r90 top
C8 "22uF" CAPC2012X135N 4584.41,867.65 r0 top
C9 "100nF" CAPC1005X55N 3882.32,807.85 r270 bottom
C10 "10uF" CAPMP3216X180N 5130.66,2749.5 r90 bottom
C11 "100nF" CAPC1005X55N 176.18,1196.85 r0 bottom
C12 "10uF" CAPMP3216X180N 4023.15,810.96 r0 bottom
C13 "100nF" CAPC1005X55N 4139.76,607.85 r270 bottom
C14 "10uF" CAPMP3216X180N 4182.83,739.69 r90 bottom
C15 "10uF" CAPMP3216X180N 6291.34,3188.98 r0 top
C16 "100nF" CAPC1005X55N 5089.37,2067.9 r0 bottom
C17 "100nF" CAPC1005X55N 5099.75,2166.04 r0 top
C18 "22uF" CAPC2012X135N 5057.86,2236.38 r0 bottom
C19 "100nF" CAPC1005X55N 5595.15,1409.89 r0 bottom
C20 "100nF" CAPC1005X55N 5579.15,1326.89 r270 bottom
C21 "100nF" CAPC1005X55N 5579.15,1541.89 r90 bottom
C22 "100nF" CAPC1005X55N 5429.15,1309.89 r270 bottom
C23 "100nF" CAPC1005X55N 5433.15,1528.89 r90 bottom
C24 "100nF" CAPC1005X55N 5490.55,710.37 r180 top
C25 "22uF" CAPC2012X135N 5128.37,1956.68 r0 top
C26 "22uF" CAPC2012X135N 5128.37,1956.68 r0 bottom
C27 "10nF" CAPC1608X87N 4898.84,1429.87 r0 top
C28 "10uF" CAPC1608X80N 5004.06,1516.31 r90 top
C29 "10uF" CAPC1608X80N 4776.84,1517.82 r90 top
C30 "100nF" CAPC1005X55N 5161.59,1558.73 r90 top
C31 "100nF" CAPC1005X55N 3709.02,231.82 r180 bottom
C32 "82pF" CAPC1608X87N 5063.61,1685.7 r0 top
C33 "100nF" CAPC1005X55N 4499.12,1322.8 r0 top
C34 "100nF" CAPC1005X55N 5103.98,1636.93 r180 top
C35 "100nF" CAPC1005X55N 5034.99,1540.1 r90 bottom
C36 "82pF" CAPC1608X87N 4962.3,1213.84 r270 bottom
C37 "100nF" CAPC1005X55N 4995.81,1540.1 r90 bottom
C38 "100nF" CAPC1005X55N 5693.51,407.39 r180 bottom
C39 "100nF" CAPC1005X55N 7351.39,65.34 r270 top
C40 "22pF" CAPC1005X55N 168.31,-61.02 r0 top
C41 "1uF" CAPC1005X55N 6507.48,521.09 r180 bottom
C42 "22uF" CAPC1608X90N 6141.73,515.75 r270 bottom
C43 "100nF" CAPC1005X55N 6868.77,565.85 r180 bottom
C44 "22uF" CAPC2012X135N 6283.46,3275.59 r180 top
C45 "100nF" CAPC1005X55N -86.61,1980.32 r90 bottom
C46 "100nF" CAPC1005X55N -23.62,1720.47 r180 bottom
C47 "10uF" CAPMP3216X180N 3590.31,761.37 r270 bottom
C48 "100nF" CAPC1005X55N 7795.28,929.13 r90 top
C49 "100nF" CAPC1005X55N 7291.34,1736.22 r0 top
C50 "100nF" CAPC1005X55N 3781.26,807.85 r270 bottom
C51 "100nF" CAPC1005X55N 7460.63,1645.67 r90 top
C52 "100nF" CAPC1005X55N 7456.69,2066.93 r270 top
C53 "100nF" CAPC1005X55N 3619.84,320.59 r0 bottom
C54 "100nF" CAPC1005X55N 7712.6,1862.2 r180 top
C55 "100nF" CAPC1005X55N 7259.84,842.52 r0 top
C56_1 "680pF" CAPC2012X135N 2290,463 r180 top (schematic designator C56)
C56_2 "680pF" CAPC2012X135N 3266.38,364.57 r180 top (schematic designator C56)
C56_3 "680pF" CAPC2012X135N 2290,738.59 r180 top (schematic designator C56)
C56_4 "680pF" CAPC2012X135N 3266.38,640.17 r180 top (schematic designator C56)
C56_5 "680pF" CAPC2012X135N 2290,1014.18 r180 top (schematic designator C56)
C56_6 "680pF" CAPC2012X135N 3266.38,915.76 r180 top (schematic designator C56)
C56_7 "680pF" CAPC2012X135N 2290,1289.77 r180 top (schematic designator C56)
C56_8 "680pF" CAPC2012X135N 3266.38,1191.35 r180 top (schematic designator C56)
C56_9 "680pF" CAPC2012X135N 4178.9,1204.26 r180 top (schematic designator C56)
C56_10 "680pF" CAPC2012X135N 2290,1565.36 r180 top (schematic designator C56)
C56_11 "680pF" CAPC2012X135N 3266.38,1466.94 r180 top (schematic designator C56)
C56_12 "680pF" CAPC2012X135N 4179.76,1476.78 r180 top (schematic designator C56)
C56_13 "680pF" CAPC2012X135N 2290,1840.95 r180 top (schematic designator C56)
C56_14 "680pF" CAPC2012X135N 3266.38,1742.53 r180 top (schematic designator C56)
C56_15 "680pF" CAPC2012X135N 4179.76,1752.37 r180 top (schematic designator C56)
C56_16 "680pF" CAPC2012X135N 2290,2116.54 r180 top (schematic designator C56)
C56_17 "680pF" CAPC2012X135N 3266.38,2018.12 r180 top (schematic designator C56)
C56_18 "680pF" CAPC2012X135N 4179.76,2027.96 r180 top (schematic designator C56)
C56_19 "680pF" CAPC2012X135N 2290,2392.13 r180 top (schematic designator C56)
C56_20 "680pF" CAPC2012X135N 3266.38,2293.71 r180 top (schematic designator C56)
C56_21 "680pF" CAPC2012X135N 4179.76,2303.55 r180 top (schematic designator C56)
C56_22 "680pF" CAPC2012X135N 2290,2667.72 r180 top (schematic designator C56)
C56_23 "680pF" CAPC2012X135N 3266.38,2569.3 r180 top (schematic designator C56)
C56_24 "680pF" CAPC2012X135N 4179.76,2579.14 r180 top (schematic designator C56)
C56_25 "680pF" CAPC2012X135N 2290,2943.31 r180 top (schematic designator C56)
C56_26 "680pF" CAPC2012X135N 3266.38,2844.89 r180 top (schematic designator C56)
C56_27 "680pF" CAPC2012X135N 4179.76,2854.73 r180 top (schematic designator C56)
C56_28 "680pF" CAPC2012X135N 2290,3218.9 r180 top (schematic designator C56)
C56_29 "680pF" CAPC2012X135N 3266.38,3120.48 r180 top (schematic designator C56)
C56_30 "680pF" CAPC2012X135N 4179.76,3130.32 r180 top (schematic designator C56)
C56_31 "680pF" CAPC2012X135N 3266.38,3396.07 r180 top (schematic designator C56)
C56_32 "680pF" CAPC2012X135N 4179.76,3405.91 r180 top (schematic designator C56)
C57 "100nF" CAPC1005X55N 7429.13,748.03 r90 top
C58 "100nF" CAPC1005X55N 7433.07,1177.17 r270 top
C59 "100nF" CAPC1005X55N 7692.91,952.76 r180 top
C60 "100nF" CAPC1005X55N 256.38,852.63 r180 bottom
C61_1 "220pF" CAPC1608X87N 2280,293 r90 top (schematic designator C61)
C61_2 "220pF" CAPC1608X87N 3256.38,194.58 r90 top (schematic designator C61)
C61_3 "220pF" CAPC1608X87N 2280,568.59 r90 top (schematic designator C61)
C61_4 "220pF" CAPC1608X87N 3256.38,470.17 r90 top (schematic designator C61)
C61_5 "220pF" CAPC1608X87N 2280,844.18 r90 top (schematic designator C61)
C61_6 "220pF" CAPC1608X87N 3256.38,745.76 r90 top (schematic designator C61)
C61_7 "220pF" CAPC1608X87N 2280,1119.77 r90 top (schematic designator C61)
C61_8 "220pF" CAPC1608X87N 3256.38,1021.35 r90 top (schematic designator C61)
C61_9 "220pF" CAPC1608X87N 4169.76,1031.19 r90 top (schematic designator C61)
C61_10 "220pF" CAPC1608X87N 2280,1395.36 r90 top (schematic designator C61)
C61_11 "220pF" CAPC1608X87N 3256.38,1296.94 r90 top (schematic designator C61)
C61_12 "220pF" CAPC1608X87N 4169.76,1306.78 r90 top (schematic designator C61)
C61_13 "220pF" CAPC1608X87N 2280,1670.95 r90 top (schematic designator C61)
C61_14 "220pF" CAPC1608X87N 3256.38,1572.53 r90 top (schematic designator C61)
C61_15 "220pF" CAPC1608X87N 4169.76,1582.37 r90 top (schematic designator C61)
C61_16 "220pF" CAPC1608X87N 2280,1946.54 r90 top (schematic designator C61)
C61_17 "220pF" CAPC1608X87N 3256.38,1848.12 r90 top (schematic designator C61)
C61_18 "220pF" CAPC1608X87N 4169.76,1857.96 r90 top (schematic designator C61)
C61_19 "220pF" CAPC1608X87N 2280,2222.13 r90 top (schematic designator C61)
C61_20 "220pF" CAPC1608X87N 3256.38,2123.71 r90 top (schematic designator C61)
C61_21 "220pF" CAPC1608X87N 4169.76,2133.55 r90 top (schematic designator C61)
C61_22 "220pF" CAPC1608X87N 2280,2497.72 r90 top (schematic designator C61)
C61_23 "220pF" CAPC1608X87N 3256.38,2399.3 r90 top (schematic designator C61)
C61_24 "220pF" CAPC1608X87N 4169.76,2409.14 r90 top (schematic designator C61)
C61_25 "220pF" CAPC1608X87N 2280,2773.31 r90 top (schematic designator C61)
C61_26 "220pF" CAPC1608X87N 3256.38,2674.89 r90 top (schematic designator C61)
C61_27 "220pF" CAPC1608X87N 4169.76,2684.73 r90 top (schematic designator C61)
C61_28 "220pF" CAPC1608X87N 2280,3048.91 r90 top (schematic designator C61)
C61_29 "220pF" CAPC1608X87N 3256.38,2950.48 r90 top (schematic designator C61)
C61_30 "220pF" CAPC1608X87N 4169.76,2960.32 r90 top (schematic designator C61)
C61_31 "220pF" CAPC1608X87N 3256.38,3226.07 r90 top (schematic designator C61)
C61_32 "220pF" CAPC1608X87N 4169.76,3235.91 r90 top (schematic designator C61)
C62_1 "2.2nF" CAPC3216X140N 1761.57,342.06 r270 bottom (schematic designator C62)
C62_2 "2.2nF" CAPC3216X140N 2737.95,243.63 r270 bottom (schematic designator C62)
C62_3 "2.2nF" CAPC3216X140N 1773.39,617.65 r270 bottom (schematic designator C62)
C62_4 "2.2nF" CAPC3216X140N 2732.05,521.19 r270 bottom (schematic designator C62)
C62_5 "2.2nF" CAPC3216X140N 1765.51,893.24 r270 bottom (schematic designator C62)
C62_6 "2.2nF" CAPC3216X140N 2745.83,790.87 r270 bottom (schematic designator C62)
C62_7 "2.2nF" CAPC3216X140N 1761.57,1168.83 r270 bottom (schematic designator C62)
C62_8 "2.2nF" CAPC3216X140N 2736.35,1070.4 r270 bottom (schematic designator C62)
C62_9 "2.2nF" CAPC3216X140N 3658.84,1078.28 r270 bottom (schematic designator C62)
C62_10 "2.2nF" CAPC3216X140N 1769.45,1440.48 r270 bottom (schematic designator C62)
C62_11 "2.2nF" CAPC3216X140N 2743.86,1347.96 r270 bottom (schematic designator C62)
C62_12 "2.2nF" CAPC3216X140N 3651.34,1357.8 r270 bottom (schematic designator C62)
C62_13 "2.2nF" CAPC3216X140N 1765.51,1723.94 r270 bottom (schematic designator C62)
C62_14 "2.2nF" CAPC3216X140N 2749.76,1621.58 r270 bottom (schematic designator C62)
C62_15 "2.2nF" CAPC3216X140N 3659.21,1629.46 r270 bottom (schematic designator C62)
C62_16 "2.2nF" CAPC3216X140N 1765.51,1995.6 r270 bottom (schematic designator C62)
C62_17 "2.2nF" CAPC3216X140N 2737.95,1893.24 r270 bottom (schematic designator C62)
C62_18 "2.2nF" CAPC3216X140N 3658.84,1901.11 r270 bottom (schematic designator C62)
C62_19 "2.2nF" CAPC3216X140N 1765.51,2271.19 r270 bottom (schematic designator C62)
C62_20 "2.2nF" CAPC3216X140N 2741.89,2165.93 r270 bottom (schematic designator C62)
C62_21 "2.2nF" CAPC3216X140N 3658.84,2180.64 r270 bottom (schematic designator C62)
C62_22 "2.2nF" CAPC3216X140N 1765.51,2538.91 r270 bottom (schematic designator C62)
C62_23 "2.2nF" CAPC3216X140N 2730.08,2444.42 r270 bottom (schematic designator C62)
C62_24 "2.2nF" CAPC3216X140N 3658.84,2464.1 r270 bottom (schematic designator C62)
C62_25 "2.2nF" CAPC3216X140N 1769.45,2822.37 r270 bottom (schematic designator C62)
C62_26 "2.2nF" CAPC3216X140N 2734.02,2720.01 r270 bottom (schematic designator C62)
C62_27 "2.2nF" CAPC3216X140N 3651.34,2735.76 r270 bottom (schematic designator C62)
C62_28 "2.2nF" CAPC3216X140N 1773.39,3097.96 r270 bottom (schematic designator C62)
C62_29 "2.2nF" CAPC3216X140N 2741.89,2999.54 r270 bottom (schematic designator C62)
C62_30 "2.2nF" CAPC3216X140N 3663.15,3008.41 r270 bottom (schematic designator C62)
C62_31 "2.2nF" CAPC3216X140N 2753.7,3275.13 r270 bottom (schematic designator C62)
C62_32 "2.2nF" CAPC3216X140N 3655.28,3283 r270 bottom (schematic designator C62)
C63 "1uF" CAPC1608X87N 4813.07,1378.66 r0 bottom
C64 "10nF" CAPC1608X87N 4710.25,1118.31 r0 top
C68 "82pF" CAPC1608X87N 4525.35,755.57 r180 bottom
C69 "100nF" CAPC1005X55N 5410.15,803.89 r180 bottom
C70 "100nF" CAPC1005X55N 5434.15,1019.89 r90 bottom
C71 "82pF" CAPC1608X87N 499.76,-0.46 r0 bottom
C76 "82pF" CAPC1608X87N 499.76,-59.52 r0 bottom
C77 "82pF" CAPC1608X87N 647.4,127.49 r180 bottom
C78 "100nF" CAPC1005X55N 3580.6,393 r270 bottom
C79 "10uF" CAPMP3216X180N 3513.54,476.82 r90 bottom
C80 "2.2uF" CAPC1608X87N 3635.59,-43.77 r180 bottom
C81 "2.2uF" CAPC1608X87N 3509.61,314.5 r0 bottom
C82 "1uF" CAPC1608X87N 3482.05,-43.77 r0 bottom
C83 "100nF" CAPC1005X55N 4139.53,483.79 r90 bottom
C90_1 "10uF" CAPMP3216X180N 2050,333 r270 bottom (schematic designator C90)
C90_2 "10uF" CAPMP3216X180N 3026.38,234.57 r270 bottom (schematic designator C90)
C90_3 "10uF" CAPMP3216X180N 2050,608.59 r270 bottom (schematic designator C90)
C90_4 "10uF" CAPMP3216X180N 3026.38,510.17 r270 bottom (schematic designator C90)
C90_5 "10uF" CAPMP3216X180N 2050,884.18 r270 bottom (schematic designator C90)
C90_6 "10uF" CAPMP3216X180N 3026.38,785.76 r270 bottom (schematic designator C90)
C90_7 "10uF" CAPMP3216X180N 2050,1159.77 r270 bottom (schematic designator C90)
C90_8 "10uF" CAPMP3216X180N 3026.38,1061.35 r270 bottom (schematic designator C90)
C90_9 "10uF" CAPMP3216X180N 3939.76,1071.19 r270 bottom (schematic designator C90)
C90_10 "10uF" CAPMP3216X180N 2050,1435.36 r270 bottom (schematic designator C90)
C90_11 "10uF" CAPMP3216X180N 3026.38,1336.94 r270 bottom (schematic designator C90)
C90_12 "10uF" CAPMP3216X180N 3939.76,1346.78 r270 bottom (schematic designator C90)
C90_13 "10uF" CAPMP3216X180N 2050,1710.95 r270 bottom (schematic designator C90)
C90_14 "10uF" CAPMP3216X180N 3026.38,1612.53 r270 bottom (schematic designator C90)
C90_15 "10uF" CAPMP3216X180N 3939.76,1622.37 r270 bottom (schematic designator C90)
C90_16 "10uF" CAPMP3216X180N 2050,1986.54 r270 bottom (schematic designator C90)
C90_17 "10uF" CAPMP3216X180N 3026.38,1888.12 r270 bottom (schematic designator C90)
C90_18 "10uF" CAPMP3216X180N 3939.76,1897.96 r270 bottom (schematic designator C90)
C90_19 "10uF" CAPMP3216X180N 2050,2262.13 r270 bottom (schematic designator C90)
C90_20 "10uF" CAPMP3216X180N 3026.38,2163.71 r270 bottom (schematic designator C90)
C90_21 "10uF" CAPMP3216X180N 3939.76,2173.55 r270 bottom (schematic designator C90)
C90_22 "10uF" CAPMP3216X180N 2050,2537.72 r270 bottom (schematic designator C90)
C90_23 "10uF" CAPMP3216X180N 3026.38,2439.3 r270 bottom (schematic designator C90)
C90_24 "10uF" CAPMP3216X180N 3939.76,2449.14 r270 bottom (schematic designator C90)
C90_25 "10uF" CAPMP3216X180N 2050,2813.32 r270 bottom (schematic designator C90)
C90_26 "10uF" CAPMP3216X180N 3026.38,2714.89 r270 bottom (schematic designator C90)
C90_27 "10uF" CAPMP3216X180N 3939.76,2724.73 r270 bottom (schematic designator C90)
C90_28 "10uF" CAPMP3216X180N 2050,3088.91 r270 bottom (schematic designator C90)
C90_29 "10uF" CAPMP3216X180N 3026.38,2990.48 r270 bottom (schematic designator C90)
C90_30 "10uF" CAPMP3216X180N 3939.76,3000.32 r270 bottom (schematic designator C90)
C90_31 "10uF" CAPMP3216X180N 3026.38,3266.07 r270 bottom (schematic designator C90)
C90_32 "10uF" CAPMP3216X180N 3939.76,3275.91 r270 bottom (schematic designator C90)
C91_1 "100nF" CAPC1005X55N 1980,283 r90 bottom (schematic designator C91)
C91_2 "100nF" CAPC1005X55N 2956.38,184.57 r90 bottom (schematic designator C91)
C91_3 "100nF" CAPC1005X55N 1980,558.59 r90 bottom (schematic designator C91)
C91_4 "100nF" CAPC1005X55N 2956.38,460.17 r90 bottom (schematic designator C91)
C91_5 "100nF" CAPC1005X55N 1980,834.18 r90 bottom (schematic designator C91)
C91_6 "100nF" CAPC1005X55N 2956.38,735.76 r90 bottom (schematic designator C91)
C91_7 "100nF" CAPC1005X55N 1980,1109.77 r90 bottom (schematic designator C91)
C91_8 "100nF" CAPC1005X55N 2956.38,1011.35 r90 bottom (schematic designator C91)
C91_9 "100nF" CAPC1005X55N 3869.76,1021.19 r90 bottom (schematic designator C91)
C91_10 "100nF" CAPC1005X55N 1980,1385.36 r90 bottom (schematic designator C91)
C91_11 "100nF" CAPC1005X55N 2956.38,1286.94 r90 bottom (schematic designator C91)
C91_12 "100nF" CAPC1005X55N 3869.76,1296.78 r90 bottom (schematic designator C91)
C91_13 "100nF" CAPC1005X55N 1980,1660.95 r90 bottom (schematic designator C91)
C91_14 "100nF" CAPC1005X55N 2956.38,1562.53 r90 bottom (schematic designator C91)
C91_15 "100nF" CAPC1005X55N 3869.76,1572.37 r90 bottom (schematic designator C91)
C91_16 "100nF" CAPC1005X55N 1980,1936.54 r90 bottom (schematic designator C91)
C91_17 "100nF" CAPC1005X55N 2956.38,1838.12 r90 bottom (schematic designator C91)
C91_18 "100nF" CAPC1005X55N 3869.76,1847.96 r90 bottom (schematic designator C91)
C91_19 "100nF" CAPC1005X55N 1980,2212.13 r90 bottom (schematic designator C91)
C91_20 "100nF" CAPC1005X55N 2956.38,2113.71 r90 bottom (schematic designator C91)
C91_21 "100nF" CAPC1005X55N 3869.76,2123.55 r90 bottom (schematic designator C91)
C91_22 "100nF" CAPC1005X55N 1980,2487.72 r90 bottom (schematic designator C91)
C91_23 "100nF" CAPC1005X55N 2956.38,2389.3 r90 bottom (schematic designator C91)
C91_24 "100nF" CAPC1005X55N 3869.76,2399.14 r90 bottom (schematic designator C91)
C91_25 "100nF" CAPC1005X55N 1980,2763.32 r90 bottom (schematic designator C91)
C91_26 "100nF" CAPC1005X55N 2956.38,2664.89 r90 bottom (schematic designator C91)
C91_27 "100nF" CAPC1005X55N 3869.76,2674.73 r90 bottom (schematic designator C91)
C91_28 "100nF" CAPC1005X55N 1980,3038.91 r90 bottom (schematic designator C91)
C91_29 "100nF" CAPC1005X55N 2956.38,2940.48 r90 bottom (schematic designator C91)
C91_30 "100nF" CAPC1005X55N 3869.76,2950.32 r90 bottom (schematic designator C91)
C91_31 "100nF" CAPC1005X55N 2956.38,3216.07 r90 bottom (schematic designator C91)
C91_32 "100nF" CAPC1005X55N 3869.76,3225.91 r90 bottom (schematic designator C91)
C92_1 "100nF" CAPC1005X55N 2200,323 r90 bottom (schematic designator C92)
C92_2 "100nF" CAPC1005X55N 3176.38,224.57 r90 bottom (schematic designator C92)
C92_3 "100nF" CAPC1005X55N 2200,598.59 r90 bottom (schematic designator C92)
C92_4 "100nF" CAPC1005X55N 3176.38,500.17 r90 bottom (schematic designator C92)
C92_5 "100nF" CAPC1005X55N 2200,874.18 r90 bottom (schematic designator C92)
C92_6 "100nF" CAPC1005X55N 3176.38,775.76 r90 bottom (schematic designator C92)
C92_7 "100nF" CAPC1005X55N 2200,1149.77 r90 bottom (schematic designator C92)
C92_8 "100nF" CAPC1005X55N 3176.38,1051.35 r90 bottom (schematic designator C92)
C92_9 "100nF" CAPC1005X55N 4089.77,1061.19 r90 bottom (schematic designator C92)
C92_10 "100nF" CAPC1005X55N 2200,1425.36 r90 bottom (schematic designator C92)
C92_11 "100nF" CAPC1005X55N 3176.38,1326.94 r90 bottom (schematic designator C92)
C92_12 "100nF" CAPC1005X55N 4089.76,1336.78 r90 bottom (schematic designator C92)
C92_13 "100nF" CAPC1005X55N 2200,1700.95 r90 bottom (schematic designator C92)
C92_14 "100nF" CAPC1005X55N 3176.38,1602.53 r90 bottom (schematic designator C92)
C92_15 "100nF" CAPC1005X55N 4089.76,1612.37 r90 bottom (schematic designator C92)
C92_16 "100nF" CAPC1005X55N 2200,1976.54 r90 bottom (schematic designator C92)
C92_17 "100nF" CAPC1005X55N 3176.38,1878.12 r90 bottom (schematic designator C92)
C92_18 "100nF" CAPC1005X55N 4089.76,1887.96 r90 bottom (schematic designator C92)
C92_19 "100nF" CAPC1005X55N 2200,2252.13 r90 bottom (schematic designator C92)
C92_20 "100nF" CAPC1005X55N 3176.38,2153.71 r90 bottom (schematic designator C92)
C92_21 "100nF" CAPC1005X55N 4089.76,2163.55 r90 bottom (schematic designator C92)
C92_22 "100nF" CAPC1005X55N 2200,2527.72 r90 bottom (schematic designator C92)
C92_23 "100nF" CAPC1005X55N 3176.38,2429.3 r90 bottom (schematic designator C92)
C92_24 "100nF" CAPC1005X55N 4089.76,2439.14 r90 bottom (schematic designator C92)
C92_25 "100nF" CAPC1005X55N 2200,2803.32 r90 bottom (schematic designator C92)
C92_26 "100nF" CAPC1005X55N 3176.38,2704.89 r90 bottom (schematic designator C92)
C92_27 "100nF" CAPC1005X55N 4089.76,2714.73 r90 bottom (schematic designator C92)
C92_28 "100nF" CAPC1005X55N 2200,3078.91 r90 bottom (schematic designator C92)
C92_29 "100nF" CAPC1005X55N 3176.38,2980.48 r90 bottom (schematic designator C92)
C92_30 "100nF" CAPC1005X55N 4089.77,2990.32 r90 bottom (schematic designator C92)
C92_31 "100nF" CAPC1005X55N 3176.38,3256.07 r90 bottom (schematic designator C92)
C92_32 "100nF" CAPC1005X55N 4089.76,3265.91 r90 bottom (schematic designator C92)
C93_1 "10uF" CAPMP3216X180N 2270,423 r180 bottom (schematic designator C93)
C93_2 "10uF" CAPMP3216X180N 3246.38,324.57 r180 bottom (schematic designator C93)
C93_3 "10uF" CAPMP3216X180N 2270,698.59 r180 bottom (schematic designator C93)
C93_4 "10uF" CAPMP3216X180N 3246.38,600.17 r180 bottom (schematic designator C93)
C93_5 "10uF" CAPMP3216X180N 2270,974.18 r180 bottom (schematic designator C93)
C93_6 "10uF" CAPMP3216X180N 3246.38,875.76 r180 bottom (schematic designator C93)
C93_7 "10uF" CAPMP3216X180N 2270,1249.77 r180 bottom (schematic designator C93)
C93_8 "10uF" CAPMP3216X180N 3246.38,1151.35 r180 bottom (schematic designator C93)
C93_9 "10uF" CAPMP3216X180N 4159.76,1161.19 r180 bottom (schematic designator C93)
C93_10 "10uF" CAPMP3216X180N 2270,1525.36 r180 bottom (schematic designator C93)
C93_11 "10uF" CAPMP3216X180N 3246.38,1426.94 r180 bottom (schematic designator C93)
C93_12 "10uF" CAPMP3216X180N 4159.76,1436.78 r180 bottom (schematic designator C93)
C93_13 "10uF" CAPMP3216X180N 2270,1800.95 r180 bottom (schematic designator C93)
C93_14 "10uF" CAPMP3216X180N 3246.38,1702.53 r180 bottom (schematic designator C93)
C93_15 "10uF" CAPMP3216X180N 4159.76,1712.37 r180 bottom (schematic designator C93)
C93_16 "10uF" CAPMP3216X180N 2270,2076.54 r180 bottom (schematic designator C93)
C93_17 "10uF" CAPMP3216X180N 3246.38,1978.12 r180 bottom (schematic designator C93)
C93_18 "10uF" CAPMP3216X180N 4159.76,1987.96 r180 bottom (schematic designator C93)
C93_19 "10uF" CAPMP3216X180N 2270,2352.13 r180 bottom (schematic designator C93)
C93_20 "10uF" CAPMP3216X180N 3246.38,2253.71 r180 bottom (schematic designator C93)
C93_21 "10uF" CAPMP3216X180N 4159.76,2263.55 r180 bottom (schematic designator C93)
C93_22 "10uF" CAPMP3216X180N 2270,2627.72 r180 bottom (schematic designator C93)
C93_23 "10uF" CAPMP3216X180N 3246.38,2529.3 r180 bottom (schematic designator C93)
C93_24 "10uF" CAPMP3216X180N 4159.76,2539.14 r180 bottom (schematic designator C93)
C93_25 "10uF" CAPMP3216X180N 2270,2903.32 r180 bottom (schematic designator C93)
C93_26 "10uF" CAPMP3216X180N 3246.38,2804.89 r180 bottom (schematic designator C93)
C93_27 "10uF" CAPMP3216X180N 4159.76,2814.73 r180 bottom (schematic designator C93)
C93_28 "10uF" CAPMP3216X180N 2270,3178.91 r180 bottom (schematic designator C93)
C93_29 "10uF" CAPMP3216X180N 3246.38,3080.48 r180 bottom (schematic designator C93)
C93_30 "10uF" CAPMP3216X180N 4159.76,3090.32 r180 bottom (schematic designator C93)
C93_31 "10uF" CAPMP3216X180N 3246.38,3356.07 r180 bottom (schematic designator C93)
C93_32 "10uF" CAPMP3216X180N 4159.76,3365.91 r180 bottom (schematic designator C93)
C95 "82pF" CAPC1608X87N 4525.35,696.39 r180 bottom
C96 "1uF" CAPC1608X87N 763.84,112.89 r180 top
C100 "100nF" CAPC1005X55N 6126.44,421.72 r0 bottom
C103 "100nF" CAPC1005X55N 6230.09,627.51 r180 bottom
C108 "1uF" CAPC1608X87N 7009.84,-14.76 r180 top
C109 "10uF" CAPMP3216X180N 7006.2,239 r0 top
C124 "10uF" CAPMP3216X180N 4699.08,1424.98 r270 bottom
C129 "22uF" CAPC2012X135N 4816.2,2705.05 r90 top
C130 "22uF" CAPC2012X135N 5390,3053 r180 bottom
C131 "22uF" CAPC2012X135N 5008.84,2972.89 r180 bottom
C132 "10uF" CAPMP3216X180N 5028.84,3057.89 r0 bottom
C133 "1uF" CAPC1608X87N 4928.26,1283.43 r90 top
C134 "10uF" CAPMP3216X180N 4833.84,2977.89 r180 bottom
C136 "10uF" CAPMP3216X180N 5376.94,2469.65 r0 bottom
C137 "22uF" CAPC2012X135N 5357.26,2135.01 r180 bottom
C138 "22uF" CAPC2012X135N 5357.26,2371.23 r180 bottom
C139 "22uF" CAPC2012X135N 5357.26,2292.49 r180 bottom
C140 "22uF" CAPC2012X135N 5357.26,2213.75 r180 bottom
C141 "22uF" CAPC2012X135N 5680,3053 r0 bottom